# Altium PCB LED_Brd-v1.0.PcbDoc
Units mil, origin at the board's own origin, x right, y up, seen from the top; angles counter-clockwise.
Board outline 478 x 1320 mil, 2 copper layers (Top Layer, Bottom Layer), stack 61.811 mil thick; 10 components, 8 nets, 32 pads, 0 vias.
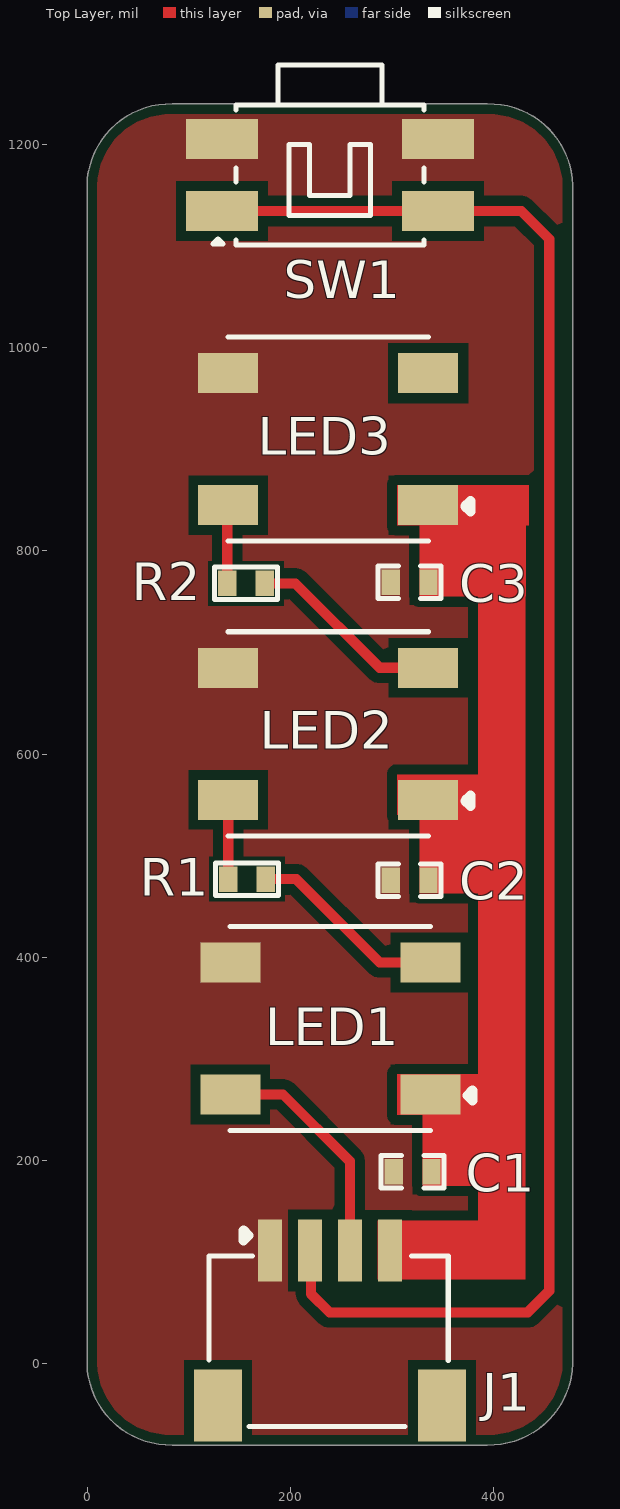
[diagram p0: Top Layer view]
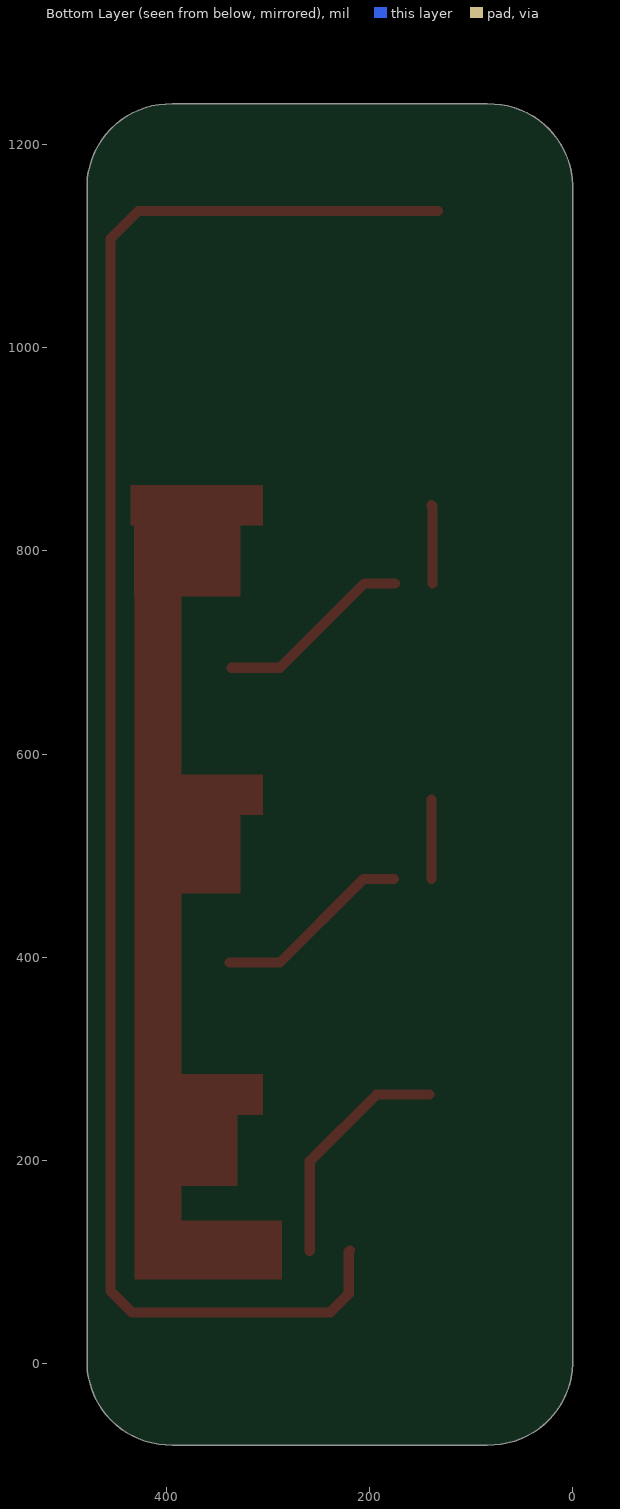
[diagram p1: Bottom Layer view, seen from below]
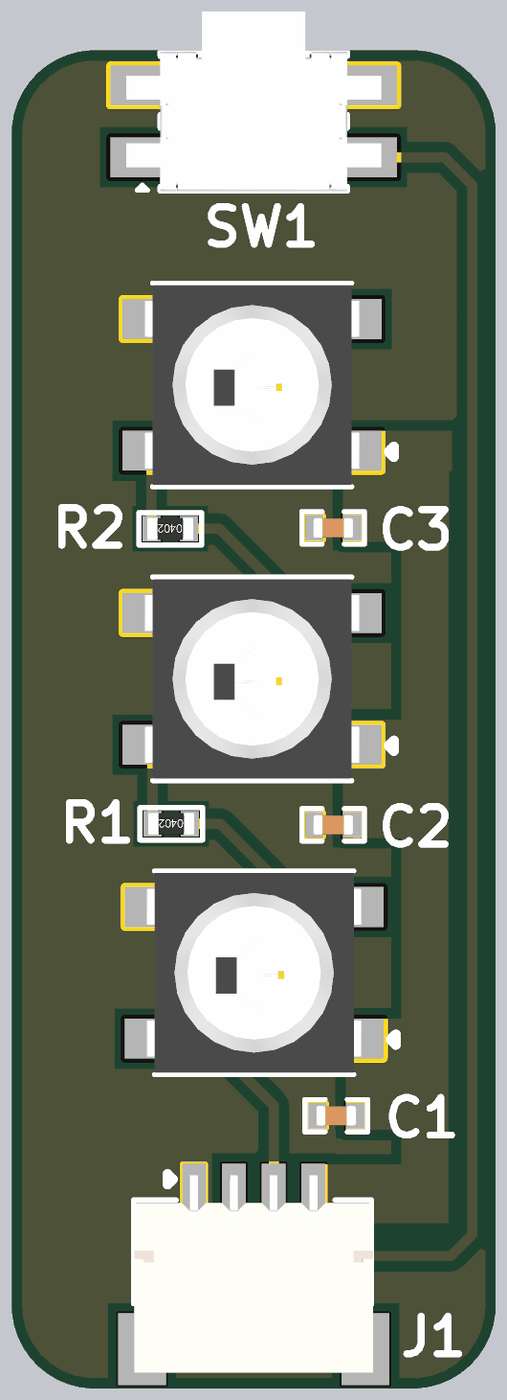
[diagram p2: 3D render of the assembled board from above, using the file's embedded part models]

## Layer stack, top to bottom
Top Solder: solder mask 0.3937, Solder Resist, Dk 3.5
Top Layer: signal copper 1.378
Dielectric 1: dielectric 59.0551, FR-4, Dk 4.8
Bottom Layer: signal copper 1.378
Bottom Solder: solder mask 0.3937, Solder Resist, Dk 3.5

## Board outline
0,0 ccw(c82,2) 84,-80 394,-80 ccw(c396,2) 478,0 478,1160 ccw(c396,1158) 394,1240 84,1240 ccw(c82,1158) 0,1160

## Design rules (kind name [scope] priority, off if disabled: settings)
BoardOutlineClearance [All] p1: gap=0 ignorepadtopadclearanceinfootprint=FALSE except(10: Poly-OutlineEdge)
Clearance [All] p1: gap=10 ignorepadtopadclearanceinfootprint=TRUE except(0: Arc-Hole Track-Hole SMDPad-Hole THPad-Hole Via-Hole Fill-Hole Poly-Hole Region-Hole Text-Hole)
PolygonConnect [All] p1: connectstyle=Direct reliefconductorwidth=10 reliefentries=4 polygonreliefangle="90 Angle" airgapwidth=10
RoutingVias [All] p1: holewidth=28 width=50 viastyle="Through Hole" minholewidth=28 minwidth=50 maxholewidth=28 maxwidth=50
SilkToSilkClearance [All] p1: silktosilkclearance=0
SilkToSolderMaskClearance [IsPad] p1: minsilkscreentomaskgap=0 clearancetoexposedcopper=TRUE
SolderMaskExpansion [All] p1: expansion=4 istentingtop=FALSE
Width [All] p1: maxlimit=10 minlimit=10 preferedwidth=10
28 further rules are at their usual default settings.

## Components (designator, comment, footprint, x,y, rotation, side; value= is the part's Value field where it differs from the comment)
C1 "100nF" Cap-0402 320.5,189 r0 top
C2 "100nF" Cap-0402 317.5,476 r0 top
C3 "100nF" Cap-0402 317.5,769 r0 top
J1 "SM04B-SRSS-TB(LF)(SN)" SM04B-SRSS-TB(LF)(SN) 239,35 r0 top locked
LED1 "WS2812B-XF02/W" WS2812B-XF02/W 239.41,330.04 r180 top locked
LED2 "WS2812B-XF02/W" WS2812B-XF02/W 237.43,620 r180 top locked
LED3 "WS2812B-XF02/W" WS2812B-XF02/W 237.43,910 r180 top locked
R1 "75R" Res-0402 157.5,477 r180 top
R2 "75R" Res-0402 156.5,768 r180 top
SW1 "EVQ-PUA02K" EVQPUA02K 239,1170 r0 top locked

## Footprints (in the part's own frame and the unit in brackets; to place one, negate y for a bottom-side part, rotate by r counter-clockwise, add the part's x,y. Pads: shape width x height; smd on the part's side, far side on the other; paste and mask are expansions set on the pad)
Cap-0402 [mil]
  rect 18x25 smd mask+2.36: 1(-18.5,0) 2(18.5,0)
  silkscreen extent -31,-16 31,16, body extent -20,-10 20,10, height 19
EVQPUA02K [mm]
  rect 1.8x1 smd: 1(-2.7,-0.9) 2(-2.7,0.9) 3(2.7,-0.9) 4(2.7,0.9)
  silkscreen extent -2.92,-1.75 2.35,2.75, body extent -3.2,-1.75 3.2,2.75, height 1.65
Res-0402 [mil]
  rect 18x25 smd mask+2.17: 1(-18.5,0) 2(18.5,0)
  silkscreen extent -32,-17 32,16, body extent -23,-11 23,11, height 16
SM04B-SRSS-TB(LF)(SN) [mm]
  rect 0.6x1.55 smd paste+0 mask+0.051: 1(-1.5,1.938) 2(-0.5,1.938) 3(0.5,1.938) 4(1.5,1.938)
  rect 1.2x1.8 smd paste+0 mask+0.051: MP1(-2.8,-1.938) MP2(2.8,-1.938)
  silkscreen extent -3.02,-2.46 2.96,2.45, body extent -3,-2.52 3,2.43, height 2.96
WS2812B-XF02/W [mm]
  rect 1.5x1 smd: 1(-2.5,1.65) 2(-2.5,-1.65) 3(2.5,-1.65) 4(2.5,1.65)
  silkscreen extent -3.56,-2.55 2.5,2.55, body extent -2.7,-2.5 2.7,2.5, height 1.55

## Part data
C1 C2 C3: library part CC0402KRX5R8BB104, "CAP CER 0.1UF 25V X5R 0402", Case Code (Imperial)=0402, Case Code (Metric)=1005, Dielectric=X5R, LCSC Part Number=C106256, Manufacturer=Yageo, Max Operating Temperature=85°C, Min Operating Temperature=-55°C, Resistor Type=Ceramic, Supplier Part Number 1=311-1697-1-ND, Tolerance=10%, Voltage Rating=25V, Capacitance=100nF, Case/Package=0402, Category="Ceramic Capacitors", ComponentLink1Description=http://www.mouser.com/ds/2/447/UPY-GPHC_X5R_4V-to-50V_25-1131599.pdf?src-supplier=Mouser, ComponentLink1URL=http://www.mouser.com/ds/2/447/UPY-GPHC_X5R_4V-to-50V_25-1131599.pdf?src-supplier=Mouser, ComponentLink2Description=http://www.yageo.com/documents/recent/UPY-GPHC_X5R_4V-to-50V-16.pdf?src-supplier=Future+Electronics, ComponentLink2URL=http://www.yageo.com/documents/recent/UPY-GPHC_X5R_4V-to-50V-16.pdf?src-supplier=Future+Electronics, ComponentLink3Description=http://www.yageo.com/documents/recent/UPY-GPHC_X5R_4V-to-50V_25.pdf?src-supplier=Digi-Key, ComponentLink3URL=http://www.yageo.com/documents/recent/UPY-GPHC_X5R_4V-to-50V_25.pdf?src-supplier=Digi-Key, Depth=0.5mm, Halogen Free="Halogen Free", Item Type=Capacitor, Lead Free="Lead Free", Length=0.039inch, Manufacturer Part Number=CC0402KRX5R8BB104, Mount="Surface Mount", Packaging="Tape and Reel", Pricing 1="1=0.10000, 10=0.03800, 50=0.02100, 100=0.01710, 500=0.01224, 1000=0.00961, 2500=0.00874, 5000=0.00804 (USD)", RoHS=Yes, RoHS Compliant=Yes, Series=CC, Stock 1=4598218, Supplier 1=Digi-Key, Thickness=0.022inch, Voltage Rating (DC)=25V, Width=0.02inch
J1: "CONN HEADER SMD R/A 4POS 1MM", Contact Resistance=40mR, Flammability Rating="UL94 V-0", Housing Color=Beige, Insulation Color=Natural, LCSC Part Number=C160404, Manufacturer=JST, Max Current Rating=1A, Max Operating Temperature=85°C, Max Voltage Rating (AC)=50V, Min Operating Temperature=-25°C, ComponentLink1Description=https://datasheet.ciiva.com/26894/getdatasheetpartid-640736-26894676.pdf?src-supplier=Verical, ComponentLink1URL=https://datasheet.ciiva.com/26894/getdatasheetpartid-640736-26894676.pdf?src-supplier=Verical, ComponentLink2Description=https://datasheet.ciiva.com/26894/getdatasheetpartid-499363-26894945.pdf?src-supplier=Verical, ComponentLink2URL=https://datasheet.ciiva.com/26894/getdatasheetpartid-499363-26894945.pdf?src-supplier=Verical, ComponentLink3Description=https://datasheet.ciiva.com/16487/jstsm04b-srss-tb-lf-sn-16487222.pdf?src-supplier=Future+Electronics, ComponentLink3URL=https://datasheet.ciiva.com/16487/jstsm04b-srss-tb-lf-sn-16487222.pdf?src-supplier=Future+Electronics, Connector Type=Header, Contact Finish - Mating=TIN, Contact Material="Copper Alloy", Contact Plating=Copper,Tin, Contact Shape=Square, Contact Type="Male Pin", Depth=4.95mm, Fastening Type=Pull, Housing Material=Polyamide, Insulation Material=Nylon, Item Type="Headers and Wire Housings", Length=6mm, Manufacturer Part Number=SM04B-SRSS-TB(LF)(SN), Max Voltage Rating (DC)=50V, Mounting Technology="Surface Mount", Number of Contacts=4NUMBER, Number of Positions=4, Number of Rows=1, Orientation="Right Angle", Packaging="Tape and Reel", Pitch=1mm, Pricing="3000=0.285, 6000=0.275 (USD)", RoHS=Yes, Series=SR, Stock=27000, Supplier="Future Electronics", Termination=Solder, Voltage Rating=50V
LED1 LED2 LED3: "SMD5050 Light Emitting Diodes (LED) ROHS", LCSC Part Number=C4154882, Manufacturer=Worldsemi, Package=SMD5050, ComponentLink1Description=LCSC, ComponentLink1URL=https://www.lcsc.com/product-detail/Light-Emitting-Diodes-LED_Worldsemi-WS2812B-XF02-W_C4154882.html, Item Type="RGB LED", Manufacturer Part Number=WS2812B-XF02/W
R1 R2: library part RC0402JR-0775RL, "RES 75 OHM 5% 1/16W 0402", Case Code (Imperial)=0402, Case Code (Metric)=1005, LCSC Part Number=C137841, Manufacturer=Yageo, Max Operating Temperature=155°C, Max Power Dissipation=63mW, Min Operating Temperature=-55°C, Power Rating=62.5mW, Resistance Tolerance=5%, Resistor Type="Thick Film", Supplier Part Number=311-75JRCT-ND, Temperature Coefficient=100ppm/°C, Voltage Rating=50V, Case/Package=0402, ComponentLink1Description=https://datasheet.ciiva.com/7983/1018594-7983612.pdf?src-supplier=Element14, ComponentLink1URL=https://datasheet.ciiva.com/7983/1018594-7983612.pdf?src-supplier=Element14, ComponentLink2Description=https://datasheet.ciiva.com/17082/pyu-rc0402-51-rohs-l-6-r-17082239.pdf?src-supplier=Future+Electronics, ComponentLink2URL=https://datasheet.ciiva.com/17082/pyu-rc0402-51-rohs-l-6-r-17082239.pdf?src-supplier=Future+Electronics, Contact Plating=Tin,Lead, Features="Moisture Resistant", Height=0.35mm, Item Type=Resistor, Lead Free="Lead Free", Length=1mm, Manufacturer Part Number=RC0402JR-0775RL, Number of Terminations=2, Packaging="Tape and Reel", Pins=2, Pricing="1=0.1, 10=0.018, 50=0.0102, 100=0.0083, 500=0.00528, 1000=0.00444, 5000=0.00307 (USD)", Reach SVHC Compliant=No, RoHS=Yes, RoHS Compliant=Yes, Series=RC, Stock=2993323, Supplier=Digikey, Termination=SMD/SMT, Tolerance=5%, Voltage Rating (DC)=50V, Width=0.5mm
SW1: "SWITCH TACTILE SPST-NO 0.05A 12V", Actuator Color=Black, Contact Current Rating=50mA, Contact Resistance=500mR, LCSC Part Number=C128539, Manufacturer=Panasonic, Max Operating Temperature=70°C, Max Voltage Rating (DC)=12V, Min Operating Temperature=-20°C, Operating Force=2.2N, Package Quantity=4000, Actuator Length=1mm, Category="Tactile Switches", ComponentLink1Description=https://datasheet.ciiva.com/30117/atv0000ce5-30117313.pdf?src-supplier=Onlinecomponents.com, ComponentLink1URL=https://datasheet.ciiva.com/30117/atv0000ce5-30117313.pdf?src-supplier=Onlinecomponents.com, ComponentLink2Description=https://datasheet.ciiva.com/26945/getdatasheetpartid-65575-26945772.pdf?src-supplier=Verical, ComponentLink2URL=https://datasheet.ciiva.com/26945/getdatasheetpartid-65575-26945772.pdf?src-supplier=Verical, ComponentLink3Description=https://datasheet.ciiva.com/7987/1679731-7987639.pdf?src-supplier=Element14, ComponentLink3URL=https://datasheet.ciiva.com/7987/1679731-7987639.pdf?src-supplier=Element14, ComponentLink4Description=https://datasheet.ciiva.com/8165/atv0000ce5-8165244.pdf?src-supplier=Avnet, ComponentLink4URL=https://datasheet.ciiva.com/8165/atv0000ce5-8165244.pdf?src-supplier=Avnet, ComponentLink5Description=https://datasheet.ciiva.com/2899/atv0000ce5-2899804.pdf?src-supplier=Digikey, ComponentLink5URL=https://datasheet.ciiva.com/2899/atv0000ce5-2899804.pdf?src-supplier=Digikey, ComponentLink6Description=https://datasheet.ciiva.com/2899/atv0000ce5-2899805.pdf?src-supplier=Digikey, ComponentLink6URL=https://datasheet.ciiva.com/2899/atv0000ce5-2899805.pdf?src-supplier=Digikey, ComponentLink7Description=https://datasheet.ciiva.com/2899/atv0000ce5-2899803.pdf?src-supplier=Digikey, ComponentLink7URL=https://datasheet.ciiva.com/2899/atv0000ce5-2899803.pdf?src-supplier=Digikey, Current Rating=50mA, Depth=4.5mm, Electrical Life=100000Cycles, Illumination Type=Non-Illuminated,Illuminated, Item Type="Tactile Switch", Length=6.4mm, Manufacturer Part Number=EVQ-PUA02K, Max Current Rating=50mA, Mechanical Life=100000Cycles, Mounting Technology="Surface Mount", Number of Positions=2NUMBER, Orientation=Straight, Packaging="Tape and Reel", Pricing="1=0.52, 10=0.461, 50=0.461, 100=0.384, 1000=0.335, 10000=0.283 (USD)", Radiation Hardening=No, RoHS=Yes, RoHS Compliant=Yes, Series=EVQPU, Stock=6621, Supplier=Mouser, Switch Function=Off-Mom, Switch Travel=0.3mm, Termination="Gull Wing", Throw Configuration=SPST, Voltage Rating (DC)=12V

## Nets (pads, with @x,y where several pads share a name; then routed paths per layer and width w, separated by ;. In a path a pad name is that pad's centre, name@x,y a point inside that pad or via, vN(x,y) a via of type N, cw(c..) or ccw(c..) an arc to the next point about the centre after c; other vN are vias at no path point)
5V: C1.2 C2.2 C3.2 J1.4 LED1.1 LED2.1 LED3.1
GND: C1.1 C2.1 C3.1 J1.1 LED1.3 LED2.3 LED3.3 SW1.2 SW1.4
LED_BRD_SW: J1.2 SW1.1 SW1.3 | length 1662.9
  Top Layer w10: SW1.1 SW1.3 427.44,1134.57 455,1107 455,71.71 433.86,50.57 238.64,50.57 220.32,68.89 220.32,110.3 J1.2
NetLED1_2: LED1.2 R1.1 | length 195.8
  Top Layer w10: R1.1 206,477 288,395 LED1.2
NetLED2_2: LED2.2 R2.1 | length 195.2
  Top Layer w10: R2.1 205,768 288.04,684.96 LED2.2
NetLED2_4: LED2.4 R1.2 | length 78
  Top Layer w10: R1.2 LED2.4
NetLED3_4: LED3.4 R2.2 | length 77.5
  Top Layer w10: R2.2 138,844.04 LED3.4
RGB_LED_1: J1.3 LED1.4 | length 233
  Top Layer w10: LED1.4 192.92,265.08 258.7,199.3 J1.3
pads on no net: J1.MP1 J1.MP2 LED3.2

## Polygon pours and split planes (outlines as drawn)
GND on Top Layer "NONET_L01_P-001" (solid, remove dead copper, pour order 0): 0,0 ccw(c82,2) 84,-80 394,-80 ccw(c396,2) 478,0 478,1160 ccw(c396,1158) 394,1240 84,1240 ccw(c82,1158) 0,1160

## Other copper
Top Layer:
  rectangle net 5V: 327,755 432,865
  rectangle net 5V: 327,463 431,572
  rectangle net 5V: 330,175 431,285
  rectangle net 5V: 286,83 431,141
  rectangle net 5V: 305,540 431,580
  rectangle net 5V: 305,245 431,285
  rectangle net 5V: 385,83 431.49,865
  rectangle net 5V: 305,825 435,865

## Silkscreen, mask and mechanical layers (free items; w line width, h text height)
Board Outline:
  the board outline again, w10

## Dimensions
0,1160 to 478,1160 on Dimension
394,1240 to 394,-80 on Dimension